# Altium PCB PCB1_new.PcbDoc (part 1 of 2)
Units mm, origin at the board's own origin, x right, y up, seen from the top; angles counter-clockwise.
Board outline 99.2 x 57.3 mm, 2 copper layers (Top Layer, Bottom Layer), stack 1.571 mm thick; 110 components, 84 nets, 483 pads, 693 vias.
Unrouted connection lines stored in the file: 9.
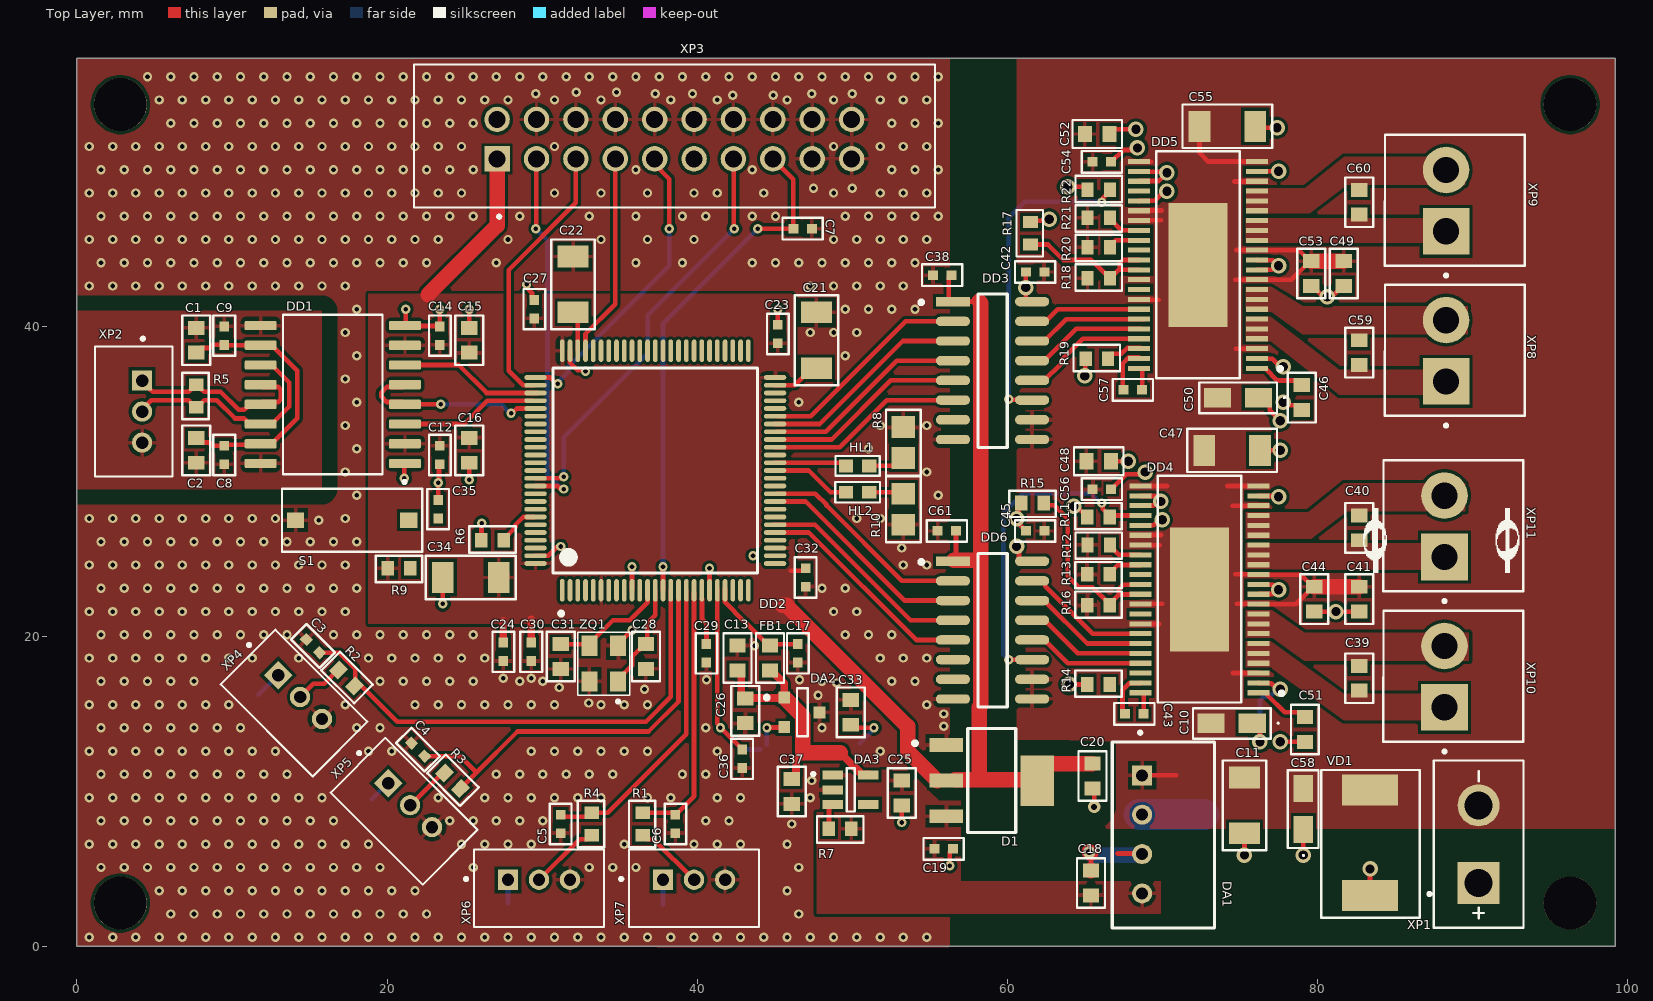
[diagram p0: Top Layer view]
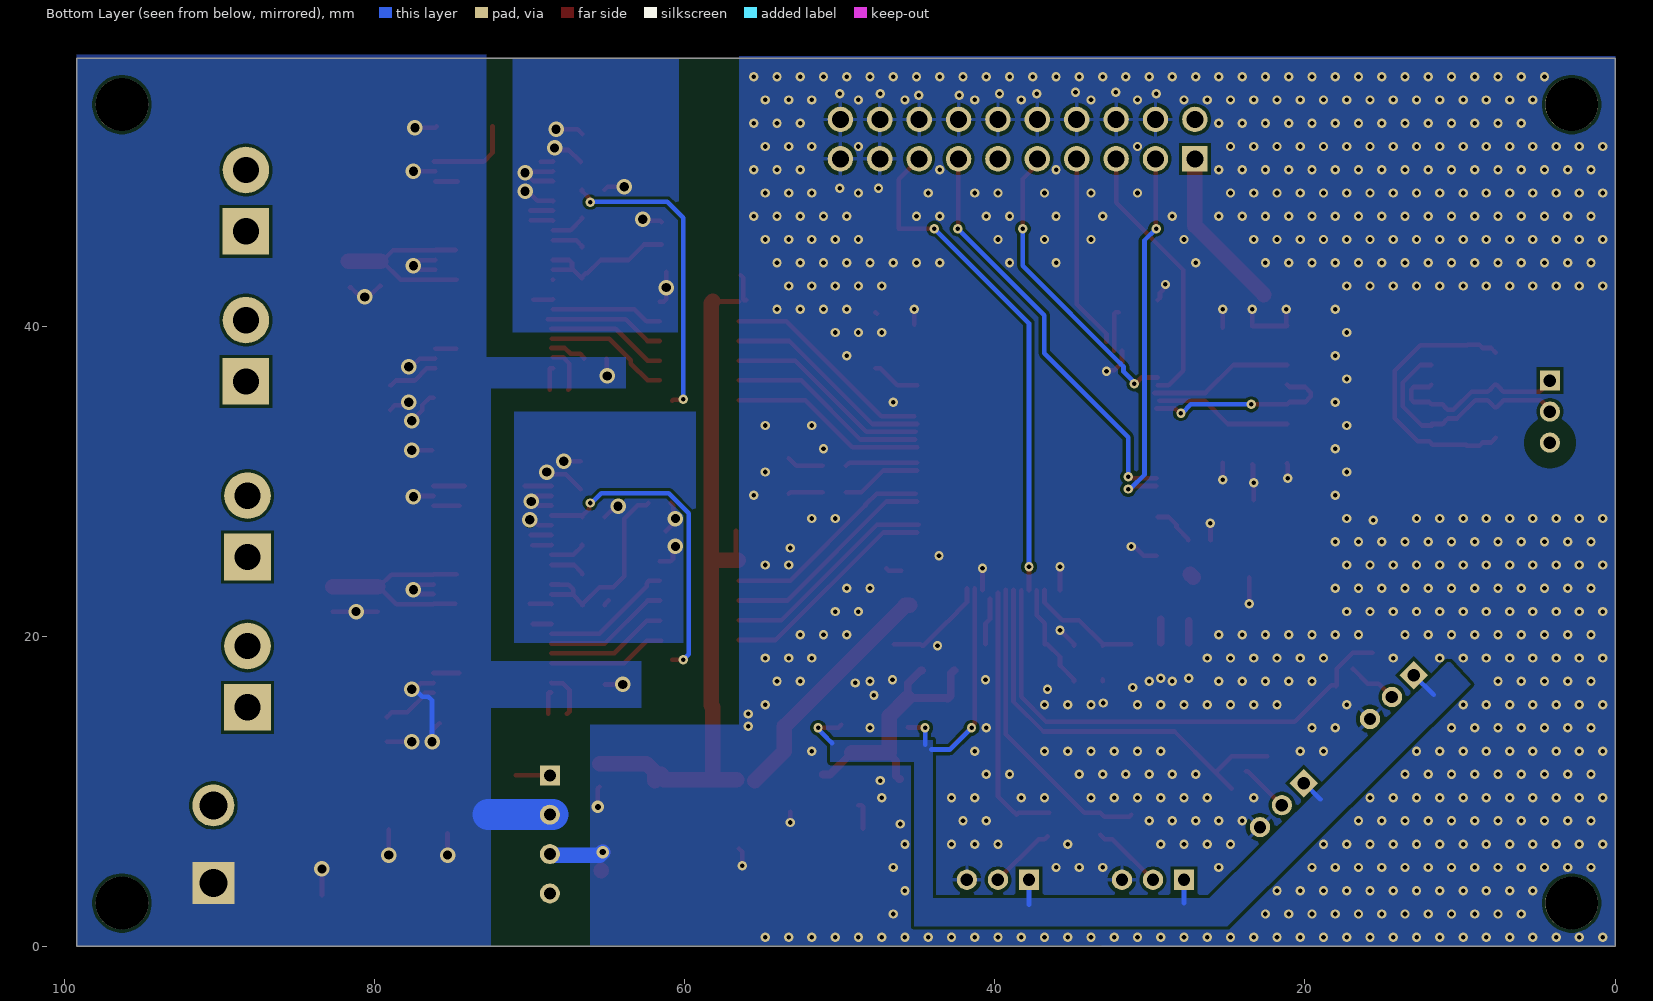
[diagram p1: Bottom Layer view, seen from below]
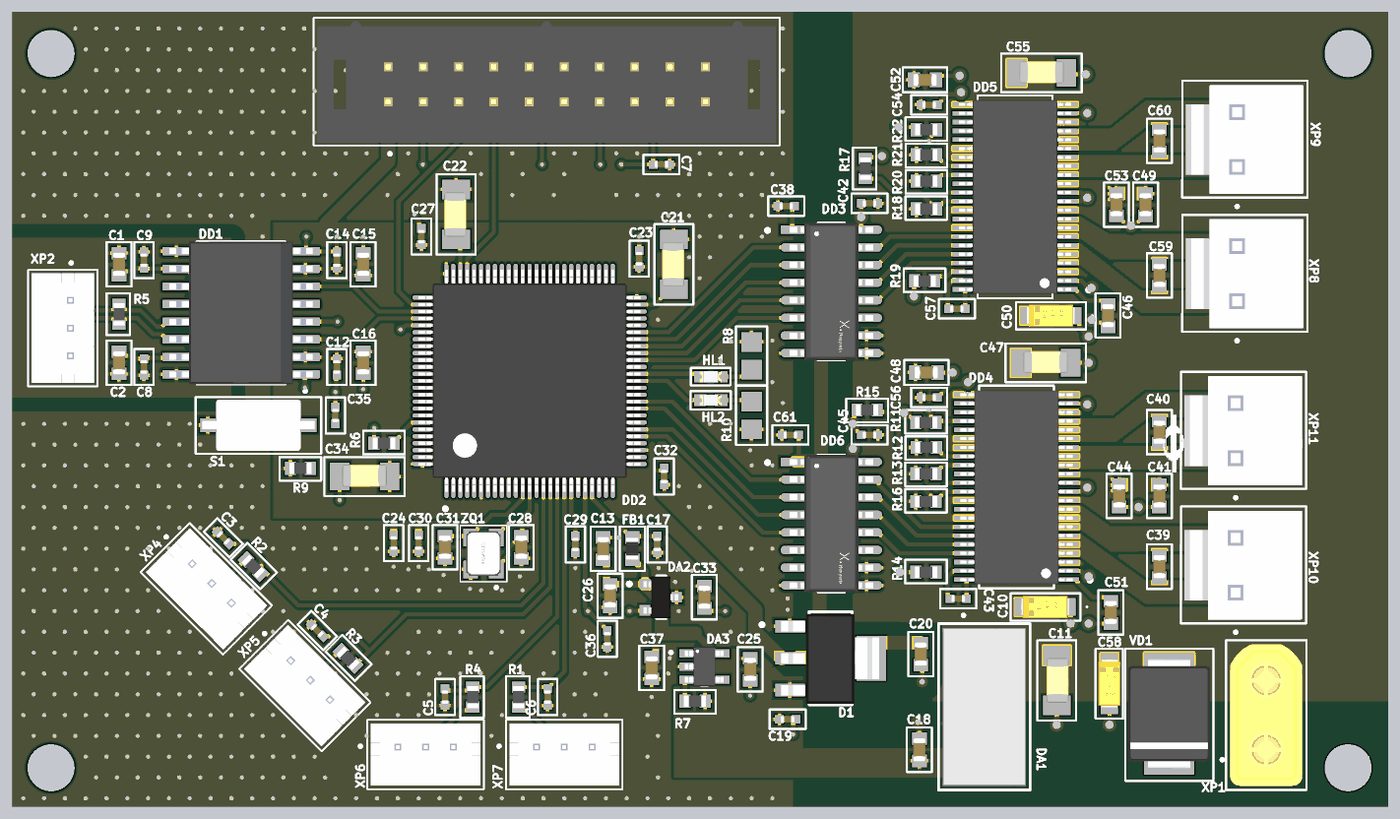
[diagram p3: 3D render of the assembled board from above, using the file's embedded part models]

## Layer stack, top to bottom
Top Solder: solder mask 0.0102, Solder Resist, Dk 3.5
Top Layer: signal copper 0.0356
Dielectric 1: core 1.5, FR4, Dk 4.6
Bottom Layer: signal copper 0.0356
Bottom Solder: solder mask 0.0102, Solder Resist, Dk 3.5

## Board outline
0,0 0,57.3 99.2,57.3 99.2,0

## Design rules (kind name [scope] priority, off if disabled: settings)
Clearance Clearance_4 [InNet('VDD') vs InNet('GND_PWR')] p1: gap=1 ignorepadtopadclearanceinfootprint=FALSE
Clearance Clearance_3 [InNet('VDD') vs InNet('GND_PWR')] p2: gap=1 ignorepadtopadclearanceinfootprint=FALSE
Clearance Clearance_2 [InNet('GND_PWR') vs InNet('GND_MCU')] p3: gap=1 ignorepadtopadclearanceinfootprint=FALSE
Clearance Clearance_1 [InNet('GND_ISO') vs InNet('GND_MCU')] p4: gap=1 ignorepadtopadclearanceinfootprint=FALSE
Clearance [All] p5: gap=0.2 ignorepadtopadclearanceinfootprint=FALSE
DiffPairsRouting [All] p1: maxlimit=0.254 minlimit=0.25 mostfreqgap=0.254 toplayer_minwidth=0.25 toplayer_maxwidth=0.4 toplayer_prefwidth=0.381 bottomlayer_minwidth=0.25 bottomlayer_maxwidth=0.4 bottomlayer_prefwidth=0.381 maxuncoupledlength=12.7
HoleSize [All] p1: absolutevalues=TRUE maxlimit=5 minlimit=0.5 maxpercent=80.000 minpercent=20.000
PolygonConnect PolygonConnect_3 [HasFootprint('XT30UPB-M')] p1: connectstyle=Direct reliefconductorwidth=0.254 reliefentries=4 polygonreliefangle="90 Angle" airgapwidth=0.254
PolygonConnect PolygonConnect_2 [(HasFootprint('HTSSOP44-DDW_TEX') or HasFootprint('SMC')or HasFootprint('TC_A') or HasFootprint('1206C')) and InNet('GND_PWR')] p2: connectstyle=Direct reliefconductorwidth=0.254 reliefentries=4 polygonreliefangle="90 Angle" airgapwidth=0.254
PolygonConnect PolygonConnect_1 [(InNet('M1_OUT_+') OR InNet('M1_OUT_-') OR InNet('M2_OUT_+') OR InNet('M2_OUT_-') OR InNet('M3_OUT_+') OR InNet('M3_OUT_-') OR InNet('M4_OUT_+') OR InNet('M4_OUT_-'))] p3: connectstyle=Direct reliefconductorwidth=0.254 reliefentries=4 polygonreliefangle="90 Angle" airgapwidth=0.254
PolygonConnect [All] p4: thpad.connectstyle=Relief thpad.reliefconductorwidth=0.25 thpad.reliefentries=4 thpad.polygonreliefangle="90 Angle" thpad.airgapwidth=0.25 smdpad.connectstyle=Relief smdpad.reliefconductorwidth=0.25 smdpad.reliefentries=4 smdpad.polygonreliefangle="90 Angle" smdpad.airgapwidth=0.25 via.connectstyle=Direct via.reliefconductorwidth=0.254 via.reliefentries=4 via.polygonreliefangle="90 Angle" via.airgapwidth=0.254
RoutingVias [All] p1: holewidth=0.6 width=1 viastyle="Through Hole" minholewidth=0.6 minwidth=1 maxholewidth=0.6 maxwidth=1
SolderMaskExpansion SolderMaskExpansion_1 [IsVia] p1: expansion=0.102 istentingtop=TRUE
SolderMaskExpansion [All] p2: expansion=0.102 istentingtop=FALSE
SupplyNets "Schematic Supply Nets_9" [InNet('DVDD1')] p1: voltage=0.000
SupplyNets "Schematic Supply Nets_8" [InNet('GND_PWR')] p2: voltage=0.000
SupplyNets "Schematic Supply Nets_7" [InNet('VDDA')] p3: voltage=0.000
SupplyNets "Schematic Supply Nets_6" [InNet('+5В')] p4: voltage=0.000
SupplyNets "Schematic Supply Nets_5" [InNet('GND_MCU')] p5: voltage=0.000
SupplyNets "Schematic Supply Nets_4" [InNet('+24В')] p6: voltage=0.000
SupplyNets "Schematic Supply Nets_3" [InNet('VDD')] p7: voltage=0.000
SupplyNets "Schematic Supply Nets_2" [InNet('VREF+')] p8: voltage=0.000
SupplyNets "Schematic Supply Nets_1" [InNet('GND_ISO')] p9: voltage=0.000
SupplyNets "Schematic Supply Nets" [InNet('DVDD2')] p10: voltage=0.000
Width [All] p1: maxlimit=3 minlimit=0.2 preferedwidth=0.3
28 further rules are at their usual default settings.

## Classes and differential pairs
component class Interfaces: C1 C2 C3 C4 C5 C6 C7 C8 C9 C11 C12 C13 C14 C15 C16 C17 C18 C19 C20 C21 C22 C23 C24 C25 C26 C27 C28 C29 C30 C31 C32 C33 C34 C35 C36 C37 C58 D1 DA1 DA2 DA3 DD1 DD2 FB1 HL1 HL2 R1 R2 R3 R4 R5 R6 R7 R8 R9 R10 S1 VD1 XP1 XP2 XP3 XP4 XP5 XP6 XP7 ZQ1
component class Drivers: C10 C38 C39 C40 C41 C42 C43 C44 C45 C46 C47 C48 C49 C50 C51 C52 C53 C54 C55 C56 C57 C59 C60 C61 DD3 DD4 DD5 DD6 R11 R12 R13 R14 R15 R16 R17 R18 R19 R20 R21 R22 XP8 XP9 XP10 XP11
differential pair RS: +RS_P -RS_N

## Components (designator, comment, footprint, x,y, rotation, side; value= is the part's Value field where it differs from the comment)
C1 "Capacitor" 0603C 7.7,39.1 r270 top value="10 мк"
C2 "Capacitor" 0603C 7.7,32 r90 top value="10 н"
C3 "Capacitor" 0402C 15.222,19.378 r315 top value="0,1 мк"
C4 "Capacitor" 0402C 22,12.7 r315 top value="0,1 мк"
C5 "Capacitor" 0402C 31.2,7.9 r90 top value="0,1 мк"
C6 "Capacitor" 0402C 38.6,7.9 r90 top value="0,1 мк"
C7 "Capacitor" 0402C 46.8,46.3 r180 top value="0,1 мк"
C8 "Capacitor" 0402C 9.5,31.7 r90 top value="0,1 мк"
C9 "Capacitor" 0402C 9.5,39.397 r270 top value="0,1 мк"
C10 "Capacitor" TC_A 74.475,14.4 r180 top value="22 мк"
C11 "Capacitor" 1206C 75.3,9.1 r270 top value="4,7 мк"
C12 "Capacitor" 0402C 23.4,31.7 r270 top value="0,1 мк"
C13 "Capacitor" 0603C 42.6,18.6 r270 top value="1 мк"
C14 "Capacitor" 0402C 23.4,39.4 r90 top value="0,1 мк"
C15 "Capacitor" 0603C 25.3,39.1 r270 top value="10 н"
C16 "Capacitor" 0603C 25.3,32 r90 top value="10 мк"
C17 "Capacitor" 0402C 46.5,18.903 r90 top value="0,1 мк"
C18 "Capacitor" 0603C 65.4,4.1 r270 top value="10 мк"
C19 "Capacitor" 0402C 55.9,6.3 r180 top value="0,1 мк"
C20 "Capacitor" 0603C 65.5,11 r90 top value="10 мк"
C21 "Capacitor" 1206C 47.7,39.1 r90 top value="2,2 мк"
C22 "Capacitor" 1206C 32,42.7 r90 top value="2,2 мк"
C23 "Capacitor" 0402C 45.2,39.503 r270 top value="0,1 мк"
C24 "Capacitor" 0402C 27.5,19.003 r90 top value="0,1 мк"
C25 "Capacitor" 0603C 53.2,9.9 r90 top value="1 мк"
C26 "Capacitor" 0603C 43.1,15.2 r90 top value="0,47 мк"
C27 "Capacitor" 0402C 29.5,41.1 r270 top value="0,1 мк"
C28 "Capacitor" 0603C 36.7,18.7 r90 top value="12 п"
C29 "Capacitor" 0402C 40.6,18.903 r90 top value="0,1 мк"
C30 "Capacitor" 0402C 29.3,19.003 r90 top value="0,1 мк"
C31 "Capacitor" 0603C 31.2,18.7 r90 top value="12 п"
C32 "Capacitor" 0402C 47,23.8 r90 top value="0,1 мк"
C33 "Capacitor" 0603C 49.9,15.1 r270 top value="1 мк"
C34 "Capacitor" 1206C 25.4,23.8 r0 top value="4,7 мк"
C35 "Capacitor" 0402C 23.3,28.203 r270 top value="0,1 мк"
C36 "Capacitor" 0402C 42.9,12.103 r90 top value="0,1 мк"
C37 "Capacitor" 0603C 46.1,10 r90 top value="1 мк"
C38 "Capacitor" 0402C 55.8,43.3 r0 top value="0,1 мк"
C39 "Capacitor" 0603C 82.7,17.3 r270 top value="2,2 н"
C40 "Capacitor" 0603C 82.7,27 r90 top value="2,2 н"
C41 "Capacitor" 0603C 82.7,22.4 r270 top value="10 н"
C42 "Capacitor" 0402C 61.8,43.5 r180 top value="0,1 мк"
C43 "Capacitor" 0402C 68.2,15 r0 top value="0,1 мк"
C44 "Capacitor" 0603C 79.8,22.4 r270 top value="10 н"
C45 "Capacitor" 0402C 61.803,26.8 r180 top value="0,1 мк"
C46 "Capacitor" 0603C 79,35.4 r270 top value="1 мк"
C47 "Capacitor" 1206C 74.5,32 r0 top value="4,7 мк"
C48 "Capacitor" 0603C 65.9,31.3 r0 top value="1 мк"
C49 "Capacitor" 0603C 81.7,43.4 r270 top value="10 н"
C50 "Capacitor" TC_A 74.875,35.4 r180 top value="22 мк"
C51 "Capacitor" 0603C 79.2,14 r270 top value="1 мк"
C52 "Capacitor" 0603C 65.803,52.4 r0 top value="1 мк"
C53 "Capacitor" 0603C 79.6,43.4 r270 top value="10 н"
C54 "Capacitor" 0402C 66.103,50.6 r0 top value="0,1 мк"
C55 "Capacitor" 1206C 74.2,52.9 r0 top value="4,7 мк"
C56 "Capacitor" 0402C 66.103,29.5 r0 top value="0,1 мк"
C57 "Capacitor" 0402C 68.103,35.9 r0 top value="0,1 мк"
C58 "Capacitor" TC_A 79.1,8.875 r90 top value="22 мк"
C59 "Capacitor" 0603C 82.7,38.3 r270 top value="2,2 н"
C60 "Capacitor" 0603C 82.7,48 r90 top value="2,2 н"
C61 "Capacitor" 0402C 56.1,26.8 r0 top value="0,1 мк"
D1 "LD1117S33CTR" SOT223 59,10.7 r0 top
DA1 "TME 2405S" CONV_TME_2405S 70.575,7.19 r270 top
DA2 "REF3030AIDBZR" SOT23-3 46.739,15.102 r0 top
DA3 "ADP150AUJZ-3.3" SOT23-5 49.9,10.1 r0 top
DD1 "ADM2682EBRIZ" SOIC-16W 16.5,35.6 r180 top
DD2 "STM32F407VGT6" LQFP100 37.3,30.7 r90 top
DD3 "ISO7762DWR" SOIC-16 59.051,37.145 r0 top
DD4 "DRV8262DDWR" HTSSOP44-DDW_TEX#1 72.399,23.032 r180 top
DD5 "DRV8262DDWR" HTSSOP44-DDW_TEX#2 72.299,43.957 r180 top
DD6 "ISO7762DWR" SOIC-16 59.051,20.405 r0 top
FB1 "BLM18AG102SN1D" 0603L 44.7,18.6 r90 top
HL1 "LED 0603 RED" 0603D_red 50.35,31 r180 top value=Красный
HL2 "LED 0603 GREEN" 0603D_green 50.35,29.3 r180 top value=Зелёный
R1 "Resistor" 0603R 36.5,7.9 r90 top value="10 к"
R2 "Resistor" 0603R 17.387,17.313 r315 top value="10 к"
R3 "Resistor" 0603R 24.213,10.687 r315 top value="10 к"
R4 "Resistor" 0603R 33.2,7.9 r90 top value="10 к"
R5 "Resistor" 0603R 7.7,35.5 r90 top value=120
R6 "Resistor" 0603R 26.8,26.2 r0 top value="10 к"
R7 "Resistor" 0603R 49.225,7.6 r180 top value="10 к"
R8 "Resistor" 0805R 53.3,32.5 r270 top value="1 к"
R9 "Resistor" 0603R 20.775,24.4 r180 top value="10 к"
R10 "Resistor" 0805R 53.3,28.2 r90 top value="1 к"
R11 "Resistor" 0603R 65.875,27.7 r0 top value="10 к"
R12 "Resistor" 0603R 65.9,25.9 r180 top value="4,7 к"
R13 "Resistor" 0603R 65.875,24 r180 top value="3,6 к"
R14 "Resistor" 0603R 65.875,16.9 r0 top value="100 к"
R15 "Resistor" 0603R 61.625,28.6 r180 top value="10 к"
R16 "Resistor" 0603R 65.875,22 r0 top value="15 к"
R17 "Resistor" 0603R 61.5,46 r90 top value="10 к"
R18 "Resistor" 0603R 65.9,43.1 r0 top value="15 к"
R19 "Resistor" 0603R 65.775,37.9 r0 top value="100 к"
R20 "Resistor" 0603R 65.903,45.1 r180 top value="3,6 к"
R21 "Resistor" 0603R 65.903,47 r180 top value="3,6 к"
R22 "Resistor" 0603R 65.9,48.8 r0 top value="10 к"
S1 "TSS-TD-19XA-XTR" TSS-TD-19XA-XTR 17.75,27.5 r180 top
VD1 "SM15T33A" SMC 83.421,6.685 r90 top value="30 В"
XP1 "XT30UPB-M" XT30UPB-M 90.4,6.6 r90 top
XP2 "JST PH-3" JST_B3B-PH-K-S(LF)(SN) 3.65,34.5 r90 top
XP3 "ARM JTAG 20" 3M_30320-6002HB 38.53,52.07 r0 top
XP4 "JST PH-3" JST_B3B-PH-K-S(LF)(SN) 14,15.7 r135 top
XP5 "JST PH-3" JST_B3B-PH-K-S(LF)(SN) 21.097,8.725 r135 top
XP6 "JST PH-3" JST_B3B-PH-K-S(LF)(SN) 29.8,3.754 r180 top
XP7 "JST PH-3" JST_B3B-PH-K-S(LF)(SN) 39.8,3.754 r180 top
XP8 "JST VH-2" B2P-VH 88.3,38.42 r90 top
XP9 "JST VH-2" B2P-VH 88.3,48.1 r90 top
XP10 "JST VH-2" B2P-VH 88.2,17.4 r90 top
XP11 "JST VH-2" B2P-VH 88.2,27.1 r90 top
ZQ1 "XTAL_GND" QSMD3.2x2.5 34.9,17.1 r180 top value="8 МГц"

## Footprints (in the part's own frame and the unit in brackets; to place one, negate y for a bottom-side part, rotate by r counter-clockwise, add the part's x,y. Pads: shape width x height; smd on the part's side, far side on the other; paste and mask are expansions set on the pad)
3M_30320-6002HB [mil]
  rect 64.5x64.5 / inner round 64.5 / far side rect 64.5x64.5 hole 43: 1(-450,-50)
  round 64.5 hole 43: 2(-450,50) 3(-350,-50) 4(-350,50) 5(-250,-50) 6(-250,50) 7(-150,-50) 8(-150,50) 9(-50,-50) 10(-50,50) 11(50,-50) 12(50,50) 13(150,-50) 14(150,50) 15(250,-50) 16(250,50) 17(350,-50) 18(350,50) 19(450,-50) 20(450,50)
  silkscreen extent -661,-201 661,189, body extent -650,-165 650,180, height 360
0402C [mm]
  rect 0.635x0.61 smd: 1(-0.597,0) 2(0.597,0)
  silkscreen extent -1.3,-0.7 1.3,0.7, body extent -0.51,-0.25 0.51,0.25, height 0.71
0603C [mm] "Chip Resistor, 2-Leads, Body 1,40x0,80mm, IPC Medium Density"
  rect 0.9x1.05 smd: 1(-0.8,0) 2(0.8,0)
  silkscreen extent -1.6,-0.9 1.6,0.9, body extent -0.85,-0.45 0.85,0.45, height 0.9
0603D_green [mm]
  rect 0.91x0.83 smd: 1(0.75,0) 2(-0.75,0)
  silkscreen extent -1.45,-0.66 1.45,0.66, body extent -0.8,-0.41 0.8,0.41, height 0.71
0603D_red [mm]
  rect 0.91x0.83 smd: 1(0.75,0) 2(-0.75,0)
  silkscreen extent -1.42,-0.64 1.42,0.64, body extent -0.8,-0.41 0.8,0.41, height 0.71
0603L [mm] "Chip Inductor, 2-Leads, Body 1,55x0,85mm, IPC Medium Density"
  rect 0.9x1.05 smd: 1(-0.8,0) 2(0.8,0)
  silkscreen extent -1.6,-0.9 1.6,0.9, body extent -0.8,-0.45 0.8,0.45, height 0.45
0603R [mm] "Chip Resistor, 2-Leads, Body 1.60x0.85mm, IPC Medium Density"
  rect 0.8x0.95 smd: 1(-0.725,0) 2(0.725,0)
  silkscreen extent -1.5,-0.8 1.5,0.9, body extent -0.8,-0.4 0.8,0.4, height 0.45
0805R [mm]
  rect 1.4x1.5 smd: 1(-1,0) 2(1,0)
  silkscreen extent -2.12,-1.12 2.12,1.12, body extent -1,-0.63 1,0.63, height 0.6
1206C [mm]
  rect 1.4x2 smd paste+0: 1(-1.8,0) 2(1.8,0)
  silkscreen extent -2.9,-1.4 2.9,1.4, body extent -1.6,-0.74 1.6,0.86, height 1.59
B2P-VH [mm]
  rect 3x3 / inner round 3 / far side rect 3x3 hole 1.7 mask+0.102: 1(-1.98,0)
  round 3 hole 1.7 mask+0.102: 2(1.98,0)
  silkscreen extent -4.93,-5.08 4.25,3.96, body extent -3.93,-4.8 3.93,3.7, height 10.9
CONV_TME_2405S [mm]
  rect 1.288x1.288 hole 0.78: 1(-3.85,-1.875)
  round 1.288 hole 0.78: 2(-1.31,-1.875) 3(1.23,-1.875) 4(3.77,-1.875)
  silkscreen extent -6.7,-3.8 6,2.8, body extent -5.7,-3.5 5.7,2.5, height 9.91
HTSSOP44-DDW_TEX#1 [mil]
  rect 55.28x12.97 smd: 1(-149.64,262.5) 2(-149.64,237.5) 3(-149.64,212.5) 4(-149.64,187.5) 5(-149.64,162.5) 6(-149.64,137.5) 7(-149.64,112.5) 8(-149.64,87.5) 9(-149.64,62.5) 10(-149.64,37.5) 11(-149.64,12.5) 12(-149.64,-12.5) 13(-149.64,-37.5) 14(-149.64,-62.5) 15(-149.64,-87.5) 16(-149.64,-112.5) 17(-149.64,-137.5) 18(-149.64,-162.5) 19(-149.64,-187.5) 20(-149.64,-212.5) 21(-149.64,-237.5) 22(-149.64,-262.5) 23(149.64,-262.5) 24(149.64,-237.5) 25(149.64,-212.5) 26(149.64,-187.5) 27(149.64,-162.5) 28(149.64,-137.5) 29(149.64,-112.5) 30(149.64,-87.5) 31(149.64,-62.5) 32(149.64,-37.5) 33(149.64,-12.5) 34(149.64,12.5) 35(149.64,37.5) 36(149.64,62.5) 37(149.64,87.5) 38(149.64,112.5) 39(149.64,137.5) 40(149.64,162.5) 41(149.64,187.5) 42(149.64,212.5) 43(149.64,237.5) 44(149.64,262.5)
  rect 150x315 smd paste-196.85: 45(0,0)
  silkscreen extent -214,-288 106,287, body extent -159,-276 159,276, height 47
HTSSOP44-DDW_TEX#2 [mil]
  rect 55.28x12.97 smd: 1(-149.64,262.5) 2(-149.64,237.5) 3(-149.64,212.5) 4(-149.64,187.5) 5(-149.64,162.5) 6(-149.64,137.5) 7(-149.64,112.5) 8(-149.64,87.5) 9(-149.64,62.5) 10(-149.64,37.5) 11(-149.64,12.5) 12(-149.64,-12.5) 13(-149.64,-37.5) 14(-149.64,-62.5) 15(-149.64,-87.5) 16(-149.64,-112.5) 17(-149.64,-137.5) 18(-149.64,-162.5) 19(-149.64,-187.5) 20(-149.64,-212.5) 21(-149.64,-237.5) 22(-149.64,-262.5) 23(149.64,-262.5) 24(149.64,-237.5) 25(149.64,-212.5) 26(149.64,-187.5) 27(149.64,-162.5) 28(149.64,-137.5) 29(149.64,-112.5) 30(149.64,-87.5) 31(149.64,-62.5) 32(149.64,-37.5) 33(149.64,-12.5) 34(149.64,12.5) 35(149.64,37.5) 36(149.64,62.5) 37(149.64,87.5) 38(149.64,112.5) 39(149.64,137.5) 40(149.64,162.5) 41(149.64,187.5) 42(149.64,212.5) 43(149.64,237.5) 44(149.64,262.5)
  rect 150x315 smd paste-196.85: у(0,0)
  silkscreen extent -214,-288 106,287, body extent -159,-276 159,276, height 47
JST_B3B-PH-K-S(LF)(SN) [mm]
  rect 1.308x1.308 / inner round 1.308 / far side rect 1.308x1.308 hole 0.8: 1(2,-0.55)
  round 1.308 hole 0.8: 2(0,-0.55) 3(-2,-0.55)
  silkscreen extent -4.2,-2.5 4.8,2.5, body extent -3.95,-2.25 3.95,2.25, height 6
LQFP100 [mm] "TSQFP, 100-Leads, Body 14,00x14,00mm, Pitch 0,50mm, IPC Medium Density"
  oval 1.45x0.3 smd: 1(-7.725,6) 2(-7.725,5.5) 3(-7.725,5) 4(-7.725,4.5) 5(-7.725,4) 6(-7.725,3.5) 7(-7.725,3) 8(-7.725,2.5) 9(-7.725,2) 10(-7.725,1.5) 11(-7.725,1) 12(-7.725,0.5) 13(-7.725,0) 14(-7.725,-0.5) 15(-7.725,-1) 16(-7.725,-1.5) 17(-7.725,-2) 18(-7.725,-2.5) 19(-7.725,-3) 20(-7.725,-3.5) 21(-7.725,-4) 22(-7.725,-4.5) 23(-7.725,-5) 24(-7.725,-5.5) 25(-7.725,-6) 51(7.725,-6) 52(7.725,-5.5) 53(7.725,-5) 54(7.725,-4.5) 55(7.725,-4) 56(7.725,-3.5) 57(7.725,-3) 58(7.725,-2.5) 59(7.725,-2) 60(7.725,-1.5) 61(7.725,-1) 62(7.725,-0.5) 63(7.725,0) 64(7.725,0.5) 65(7.725,1) 66(7.725,1.5) 67(7.725,2) 68(7.725,2.5) 69(7.725,3) 70(7.725,3.5) 71(7.725,4) 72(7.725,4.5) 73(7.725,5) 74(7.725,5.5) 75(7.725,6)
  oval 0.3x1.45 smd: 26(-6,-7.725) 27(-5.5,-7.725) 28(-5,-7.725) 29(-4.5,-7.725) 30(-4,-7.725) 31(-3.5,-7.725) 32(-3,-7.725) 33(-2.5,-7.725) 34(-2,-7.725) 35(-1.5,-7.725) 36(-1,-7.725) 37(-0.5,-7.725) 38(0,-7.725) 39(0.5,-7.725) 40(1,-7.725) 41(1.5,-7.725) 42(2,-7.725) 43(2.5,-7.725) 44(3,-7.725) 45(3.5,-7.725) 46(4,-7.725) 47(4.5,-7.725) 48(5,-7.725) 49(5.5,-7.725) 50(6,-7.725) 76(6,7.725) 77(5.5,7.725) 78(5,7.725) 79(4.5,7.725) 80(4,7.725) 81(3.5,7.725) 82(3,7.725) 83(2.5,7.725) 84(2,7.725) 85(1.5,7.725) 86(1,7.725) 87(0.5,7.725) 88(0,7.725) 89(-0.5,7.725) 90(-1,7.725) 91(-1.5,7.725) 92(-2,7.725) 93(-2.5,7.725) 94(-3,7.725) 95(-3.5,7.725) 96(-4,7.725) 97(-4.5,7.725) 98(-5,7.725) 99(-5.5,7.725) 100(-6,7.725)
  silkscreen extent -9.35,-6.6 6.6,6.6, body extent -8,-8 8,8, height 1.6
QSMD3.2x2.5 [mm] "Кварцевый резонатор"
  rect 1.05x1.3 smd: 1(0,0) 2(1.85,-2.3) 3(0,-2.3) 3(1.85,0)
  silkscreen extent -0.76,-3.17 2.6,1.4, body extent -0.32,-2.75 2.18,0.45, height 0.8
SMC [mm]
  rect 2x3.6 smd: 1(3.415,0.021) 2(-3.385,0.021)
  silkscreen extent -4.83,-3.91 4.7,3.18, body extent -3.96,-2.93 3.99,2.97, height 2.65
SOIC-16 [mm] "SOT109-1"
  rect 2.204x0.608 smd: 1(-2.551,4.445)
  rrect100% 2.204x0.608 smd: 2(-2.551,3.175) 3(-2.551,1.905) 4(-2.551,0.635) 5(-2.551,-0.635) 6(-2.551,-1.905) 7(-2.551,-3.175) 8(-2.551,-4.445) 9(2.551,-4.445) 10(2.551,-3.175) 11(2.551,-1.905) 12(2.551,-0.635) 13(2.551,0.635) 14(2.551,1.905) 15(2.551,3.175) 16(2.551,4.445)
  silkscreen extent -4.72,-4.95 0.95,4.95, body extent -4.15,-5.45 4.15,5.45, height 0.25
SOIC-16W [mm]
  rrect25% 2.05x0.6 smd: 1(-4.655,4.445) 2(-4.655,3.175) 3(-4.655,1.905) 4(-4.655,0.635) 5(-4.655,-0.635) 6(-4.655,-1.905) 7(-4.655,-3.175) 8(-4.655,-4.445) 9(4.655,-4.445) 10(4.655,-3.175) 11(4.655,-1.905) 12(4.655,-0.635) 13(4.655,0.635) 14(4.655,1.905) 15(4.655,3.175) 16(4.655,4.445)
  silkscreen extent -4.72,-5.15 3.2,5.75, body extent -5.16,-5.15 5.16,5.15, height 2.65
SOT23-3 [mil]
  rect 30x30 smd: 1(-44.29,37.4) 2(-44.29,-37.6) 3(45.71,-0.1)
  silkscreen extent -93,-61 16,61, body extent -48,-60 50,59, height 41
SOT23-5 [mm]
  rect 1.32x0.59 smd: 1(-1.145,0.95) 2(-1.145,0) 3(-1.145,-0.95) 4(1.145,-0.95) 5(1.145,0.95)
  silkscreen extent -2.51,-1.4 0.25,1.4, body extent -1.4,-1.45 1.4,1.45, height 1.45
SOT223 [mm] "SOT223, ld1117"
  rect 2.15x0.9 smd: 1(-2.925,2.3) 2(-2.925,0) 3(-2.925,-2.3)
  rect 2.15x3.25 smd: 2(2.925,0)
  silkscreen extent -5.08,-3.35 1.55,3.35, body extent -3.56,-3.3 3.51,3.2, height 1.6
TC_A [mm] "Tantalum capacitor, type A,  1 pin - plus"
  rect 1.75x1.25 smd: 1(-1.325,0) 2(1.325,0)
  silkscreen extent -3.05,-0.97 2.5,1, body extent -1.73,-0.8 1.73,0.8, height 1.64
TSS-TD-19XA-XTR [mm]
  rect 1.1x1 smd: 1(-3.65,0) 2(3.65,0)
  silkscreen extent -4.52,-2.02 4.53,2.05, body extent -4.05,-1.85 4.05,1.85, height 2.55
XT30UPB-M [mm]
  rect 2.7x2.7 hole 1.8: 1(-2.5,0)
  round 2.7 hole 1.8: 2(2.5,0)
  silkscreen extent -5.4,-2.9 5.4,2.9, body extent -5.1,-2.6 5.1,2.6, height 10.7

## Part data
C1 C16 C18 C20: library part Capacitor_10u_10_10V_X7R_0603C, "Конденсатор 0603C ёмкостью 10 мк 10%, 10 В, X7R", Capacity (nF)=10000, Dielectric=X7R, Tolerance=10%, Voltage (V)=10, Datasheet=https://static.chipdip.ru/lib/893/DOC031893419.pdf, Part Number=Capacitor_10u_10_10V_X7R_0603C, Автор=glebmih
C2 C15 C41 C44 C49 C53: library part Capacitor_10n_10_50V_X7R_0603C, "Конденсатор 0603C ёмкостью 10 н 10%, 50 В, X7R", Capacity (nF)=10, Dielectric=X7R, Tolerance=10%, Voltage (V)=50, Part Number=Capacitor_10n_10_50V_X7R_0603C
C3 C4 C5 C6 C7 C8 C9 C12 C14 C17 C19 C23 C24 C27 C29 C30 C32 C35 C36 C38 C42 C43 C45 C54 C56 C57 C61: library part Capacitor_0,1u_10_16V_X7R_0603C, "Конденсатор 0402C ёмкостью 0,1 мк 10%, 16 В, X7R", Capacity (nF)=100, Dielectric=X7R, Tolerance=10%, Voltage (V)=16, Part Number=Capacitor_0,1u_10_16V_X7R_0603C, Автор=rreali
C10 C50 C58: library part Capacitor_22u_10_50V_TC_A, "Танталовый конденсатор", Capacity (uF)=22, Tolerance=0,1, Voltage (V)=50, Part Number=Capacitor_22u_10_50V_TC_A, Type=Tantalum
C11 C34 C47 C55: library part Capacitor_4,7u_10_50V_X7R_1206C, "Конденсатор 1206C ёмкостью 4,7 мк 10%, 50 В, X7R", Capacity (nF)=4700, Dielectric=X7R, Tolerance=10%, Voltage (V)=50, Part Number=Capacitor_4,7u_10_50V_X7R_1206C
C13 C25 C33 C37 C46 C48 C51 C52: library part Capacitor_1u_10_25V_X7R_0603C, "Конденсатор 0603C ёмкостью 1 мк 10%, 25 В, X7R", Capacity (nF)=1000, Dielectric=X7R, Tolerance=10%, Voltage (V)=25, Part Number=Capacitor_1u_10_25V_X7R_0603C
C21 C22: library part Capacitor_2,2u_10_50V_X7R_1206C, "Конденсатор 1206C ёмкостью 2,2 мк 10%, 50 В, X7R", Capacity (nF)=2200, Dielectric=X7R, Tolerance=10%, Voltage (V)=50, Part Number=Capacitor_2,2u_10_50V_X7R_1206C
C26: library part Capacitor_0,47u_10_50V_X7R_0603C, "Конденсатор 0603C ёмкостью 0,47 мк 10%, 50 В, X7R", Capacity (nF)=470, Dielectric=X7R, Tolerance=10%, Voltage (V)=50, Part Number=Capacitor_0,47u_10_50V_X7R_0603C
C28 C31: library part Capacitor_12p_5_50V_NP0_0603C, "Конденсатор 0603C ёмкостью 12 п 5%, 50 В, NP0", Capacity (nF)=0,012, Dielectric=NP0, Tolerance=5%, Voltage (V)=50, Part Number=Capacitor_12p_5_50V_NP0_0603C, Автор=glebmih
C39 C40 C59 C60: library part Capacitor_2,2n_10_50V_X7R_0603C, "Конденсатор 0603C ёмкостью 2,2 н 10%, 50 В, X7R", Capacity (nF)=2,2, Dielectric=X7R, Tolerance=10%, Voltage (V)=50, Part Number=Capacitor_2,2n_10_50V_X7R_0603C
D1: "Линейный стабилизатор напряжения", Part Number=LD1117S33CTR
DA1: "DC/DC преобразователь, 1Вт, вход 21.6-26.4В, выход 5В/ 200мА", Part Number="TME 2405S"
DA2: "Источник опорного напряжения, 3В", Datasheet=https://static.chipdip.ru/lib/248/DOC000248445.pdf, Part Number=REF3030AIDBZR, Автор=glebmih
DA3: "Стабилизатор напряжения 3.3В 150мА", Datasheet=https://static.chipdip.ru/lib/986/DOC003986581.pdf, Part Number=ADP150AUJZ-3.3, Автор=glebmih
DD1: "Изолированный RS-485 приемопередатчик, с встроенным DC-DC преобразователем", Part Number=ADM2682EBRIZ
DD2: "Микроконтроллер", Part Number=STM32F407VGT6
DD3 DD6: "Шестиканальный цифровой изолятор", Part Number=ISO7762DWR
DD4 DD5: "Спаренный драйвер управления ДПТ", Part Number=DRV8262DDWR
FB1: "Дроссель подавления ЭМП", Datasheet=https://www.chipdip.ru/product/blm18ag102sn1d-1-kom-0.4a-0603-drossel-podavleniya-murata-9000029220, Part Number=BLM18AG102SN1D, Автор=glebmih
HL1: "Светодиод 0603 Красный", Part Number="LED 0603 RED", Автор=rreali
HL2: "Светодиод 0603 Зелёный", Part Number="LED 0603 GREEN", Автор=rreali
R1 R2 R3 R4 R6 R7 R9 R11 R15 R17 R22: library part Resistor_10k_1_0603, "Резистор номиналом 10 кОм 1%", Tolerance=1%, Part Number=Resistor_10k_1_0603
R5: library part Resistor_120_1_0603, "Резистор номиналом 120 Ом 1%", Tolerance=1%, Part Number=Resistor_120_1_0603
R8 R10: library part Resistor_1k_0805, "Резистор номиналом 1 кОм 1%", Tolerance=1%, Part Number=Resistor_1k_0805, Автор=glebmih
R12: library part Resistor_4.7k_1_0603, "Резистор номиналом 4,7 кОм 1%", Tolerance=1%, Part Number=Resistor_4.7k_1_0603
R13 R20 R21: library part Resistor_3.6k_1_0603, "Резистор номиналом 3,6 кОм 1%", Tolerance=1%, Part Number=Resistor_3.6k_1_0603
R14 R19: library part Resistor_100k_1_0603, "Резистор номиналом 100 кОм 1%", Tolerance=1%, Part Number=Resistor_100k_1_0603
R16 R18: library part Resistor_15k_1_0603, "Резистор номиналом 15 кОм 1%", Tolerance=1%, Part Number=Resistor_15k_1_0603
S1: "Тактовая кнопка", Datasheet=https://cdn.promelec.ru/upload/items/2023/04/17/TSS-TD-19XA.pdf, Part Number=TSS-TD-19XA-XTR, Автор=glebmih
VD1: "Защитный диод на 30 В, рассеиваемая мощность 1500 Вт", Power (W)=1500, Voltage (V)=30, Part Number=SM15T33A
XP1: "Вилка прямая силовая 2-контактная на плату, 15А, 500В", Datasheet=https://www.tme.eu/en/details/xt30upb-m/dc-power-connectors/amass/, Part Number=XT30UPB-M, Автор=Гидролиба
XP2 XP4 XP5 XP6 XP7: "Вилка штыревая 3-контактная на плату прямая с ключом, шаг 2,0 мм", Datasheet=https://ihmevekotin.fi/liittimet/314-jst-ph-3-pinninen-liitaentaejohto.html, Part Number="JST PH-3", Автор=Макс
XP3: "Вилка штыревая двухрядная 20-контактная, шаг 2,54", Datasheet=https://support.arm.com/documentation/dui0499/a/Target-Interface-Connections/ARM-JTAG-20, Part Number="ARM JTAG 20", Автор=Макс
XP8 XP9 XP10 XP11: "Вилка силовая 2-контактная на плату прямая, шаг 3,96 мм", Datasheet=https://www.tme.eu/en/details/b2p-vh/raster-signal-connectors-3-96mm/jst/b2p-vh-lf-sn/, Part Number="JST VH-2", Автор=Макс
ZQ1: "Кварцевый резонатор с входом земли", Part Number=XTAL_GND

## Free pads (board coordinates)
  round 3.4 hole 3.4 unplated: 3(2.8,2.8) 3(2.8,54.3) 3(96.3,2.8) 3(96.3,54.3)

## Via types
v1: diameter 0.6, hole 0.3, Top Layer to Bottom Layer, tented both sides, 658 vias
v2: diameter 1, hole 0.6, Top Layer to Bottom Layer, tented both sides, 33 vias
v3: diameter 0.8, hole 0.4, Top Layer to Bottom Layer, tented both sides, 2 vias

## Nets (pads, with @x,y where several pads share a name; then routed paths per layer and width w, separated by ;. In a path a pad name is that pad's centre, name@x,y a point inside that pad or via, vN(x,y) a via of type N, cw(c..) or ccw(c..) an arc to the next point about the centre after c; other vN are vias at no path point)
+5В: C18.2 C19.2 C25.2 D1.3 DA1.4 DA3.1 R7.1
+24В: C10.1 C11.2 C41.2 C44.2 C46.2 C47.2 C49.2 C50.1 C51.2 C53.2 C55.2 C58.1 DA1.2 DD4.2 DD4.11 DD4.12 DD4.21 DD5.2 DD5.11 DD5.12 DD5.21 R14.1 R19.1 VD1.2 XP1.1 | length 42.5
  Top Layer w0.3: v2(64,16.9) R14.1@65.15,16.9 ; v2(65,36.8) 65.025,36.825 65.025,37.875 R19.1@65.05,37.9 ; v2(75.3,5.9) C11.2@75.3,7.3 ; C10.1@75.8,14.4 75.825,14.4 76.3,13.925 v2(76.3,13.2) ; C55.2@76,52.9 76.1,52.8 v2(77.4,52.8) ; DD5.2@76.1,37.925 76.115,37.91 77.1,37.91 77.611,37.4 v2(77.8,37.4) ; DD5.11@76.1,43.64 76.115,43.655 77.077,43.655 77.182,43.76 77.36,43.76 v2(77.5,43.9) 77.14,44.26 76.115,44.26 DD5.12@76.1,44.275 ; DD5.21@76.1,49.99 76.105,49.995 77.495,49.995 v2(77.5,50) ; DD4.2@76.2,17 76.215,16.985 77.025,16.985 77.411,16.6 v2(77.6,16.6) ; DD4.11@76.2,22.715 76.215,22.73 77.102,22.73 77.207,22.835 77.335,22.835 v2(77.5,23) 77.165,23.335 76.215,23.335 DD4.12@76.2,23.35 ; DD4.21@76.2,29.065 76.215,29.05 77.45,29.05 v2(77.5,29) ; C50.1@76.2,35.4 76.45,35.4 76.925,34.925 76.925,34.575 v2(77.6,33.9) ; C47.2@76.3,32 v2(77.6,32) ; v2(77.6,13.2) C51.2@79.2,13.2 ; v2(77.8,35.1) 77.989,35.1 78.189,34.9 78.7,34.9 C46.2@79,34.6 ; v2(79.1,5.9) C58.1@79.1,7.55 ; C53.2@79.6,42.6 79.675,42.6 80.249,42.026 80.513,42.026 v2(80.647,41.892) 80.781,42.026 81.051,42.026 81.525,42.5 C49.2@81.6,42.5 ; C44.2@79.8,21.6 C41.2@82.7,21.6 ; VD1.2@83.4,3.3 v2(83.4,5)
  Bottom Layer w0.3: v2(76.3,13.2) 76.3,15.875 76.534,16.11 76.92,16.11 77.411,16.6 v2(77.6,16.6)
  Bottom Layer w2: DA1.2@68.5,8.5 72.7,8.5
  other v2: 81.2,21.6
ADC_POT1: C3.2 DD2.15 R2.2 | length 32.7
  Top Layer w0.3: C3.2@15.644,18.956 15.653,18.947 16.92,18.947 17.953,17.914 17.953,16.847 R2.2@18,16.8 ; R2.2@18,16.853 18.307,16.853 20.66,14.5 36.7,14.5 38.3,16.1 DD2.15@38.3,22.975
ADC_POT2: C4.2 DD2.16 R3.2 | length 27.3
  Top Layer w0.3: C4.2@22.422,12.278 22.431,12.269 24.731,12.269 25.7,11.3 ; R3.2@24.725,10.175 25.775,11.225 28.414,13.864 36.864,13.864 38.8,15.8 DD2.16@38.8,23
ADC_POT3: C5.2 DD2.17 R4.2 | length 19.9
  Top Layer w0.3: C5.2@31.2,8.497 31.3,8.397 31.322,8.375 R4.2@32.95,8.375 ; R4.2@33.3,8.625 34.225,8.625 39.3,13.7 DD2.17@39.3,23 ; R4.2@32.95,8.375 R4.2@33.2,8.625 R4.2@32.95,8.375
ADC_POT4: C6.2 DD2.18 R1.2 | length 16.9
  Top Layer w0.3: R1.2@36.5,8.625 38.472,8.625 C6.2@38.6,8.497 ; C6.2@38.6,8.509 38.755,8.664 38.767,8.664 39.8,9.697 DD2.18@39.8,22.8
BUTTON: C35.2 DD2.47 R9.1 S1.1
DRV1_DIR1: DD3.13 DD5.40 | length 7.9
  Top Layer w0.3: DD3.13@61.602,37.78 62.4,37.78 64.45,39.83 DD5.40@68.606,39.83
DRV1_DIR2: DD3.15 DD5.38 | length 7.2
  Top Layer w0.3: DD3.15@61.602,40.32 62.483,40.32 63.263,41.1 DD5.38@68.498,41.1
DRV1_PWM1: DD3.12 DD5.41 | length 8.2
  Top Layer w0.3: DD3.12@61.602,36.51 62.4,36.51 63.482,37.592 63.482,37.802 64.875,39.195 68.557,39.195 DD5.41@68.498,39.195
DRV1_PWM2: DD3.14 DD5.39 | length 7.8
  Top Layer w0.3: DD3.14@61.602,39.05 62.4,39.05 63.815,40.465 DD5.39@68.837,40.465
DRV2_DIR3: DD4.40 DD6.13 | length 7.9
  Top Layer w0.3: DD6.13@61.6,21 62.44,21 64.535,18.905 DD4.40@68.598,18.905
DRV2_DIR4: DD4.38 DD6.15 | length 8.5
  Top Layer w0.3: DD6.15@61.602,23.58 62.317,23.58 62.459,23.438 62.459,23.241 65.525,20.175 DD4.38@68.598,20.175
DRV2_PWM3: DD4.41 DD6.12 | length 7.7
  Top Layer w0.3: DD6.12@61.511,19.711 62.459,19.711 63.9,18.27 DD4.41@68.598,18.27
DRV2_PWM4: DD4.39 DD6.14 | length 8.1
  Top Layer w0.3: DD6.14@61.602,22.31 62.4,22.31 65.17,19.54 DD4.39@68.598,19.54
DVDD1: C42.2 C52.2 C54.2 DD3.16 DD5.24 DD5.25 DD5.27 R17.2 R22.1 | length 14.6
  Top Layer w0.3: C42.2@61.203,43.5 C42.2@61.203,43.5 61.202,42.501 v2(61.2,42.5) 61.2,41.732 61.342,41.59 DD3.16@61.602,41.59 ; R17.2@61.5,46.725 61.588,46.812 62.612,46.812 v2(62.7,46.9) ; v2(63.9,49) 64.975,49 R22.1@65.175,48.8 ; C52.2@66.603,52.4 66.903,52.7 v2(68.3,52.7) ; C54.2@66.7,50.6 66.713,50.6 67.479,51.366 68.166,51.366 v2@68.3,51.5 ; DD5.27@68.498,48.085 68.513,48.1 69.51,48.1 70.111,48.7 v2(70.3,48.7) ; DD5.25@68.498,49.355 68.513,49.37 69.77,49.37 v2(70.3,49.9) 70.225,49.975 68.513,49.975 DD5.24@68.498,49.99
  other v2: 68.4,51.5
DVDD2: C45.2 C48.2 C56.2 DD4.24 DD4.25 DD4.27 DD6.16 R11.1 R15.2 | length 13.6
  Top Layer w0.3: v2(60.6,25.8) 60.6,25.611 60.762,25.449 60.762,24.992 60.904,24.85 DD6.16@61.602,24.85 ; R15.2@60.9,28.6 60.734,28.434 60.734,27.734 v2(60.6,27.6) 60.734,27.466 60.734,27.26 61.194,26.8 C45.2@61.206,26.8 ; v2(64.3,28.387) 64.382,28.468 R11.1@65.15,27.7 ; C56.2@66.7,29.5 66.713,29.5 67.662,30.45 68.152,30.45 68.168,30.466 68.766,30.466 v2(68.9,30.6) ; C48.2@66.7,31.3 v2(67.8,31.3) ; DD4.27@68.598,27.16 68.613,27.175 69.457,27.175 69.802,27.52 v2(69.992,27.52) ; DD4.25@68.598,28.43 68.613,28.445 69.455,28.445 69.711,28.7 v2(69.9,28.7) 69.55,29.05 68.613,29.05 DD4.24@68.598,29.065
  Bottom Layer w0.3: v2@64.218,28.468 v2(64.3,28.387) ; v2@69.992,27.324 v2(69.992,27.52)
FAULT_DRV_1: DD3.11 DD5.26 R22.2 | length 19.9
  Top Layer w0.3: v1(60.1,35.3) 60.13,35.27 60.73,35.27 DD3.11@60.8,35.2 ; v1(66.1,48) 66.157,48.057 66.157,48.257 66.625,48.725 R22.2@66.625,48.8
  Bottom Layer w0.3: v1(60.1,35.3) 60.1,47 61.141,48.041 66.059,48.041 v1(66.1,48)